# Altium PCB CONN-TH_XT90PW2X2-MGY_2026-10-20.pcbdoc
Units mm, origin at the board's own origin, x right, y up, seen from the top; angles counter-clockwise.
Board outline 49.52 x 53.59 mm, 2 copper layers (Top Layer, Bottom Layer); 1 components, 0 nets, 6 pads, 0 vias.
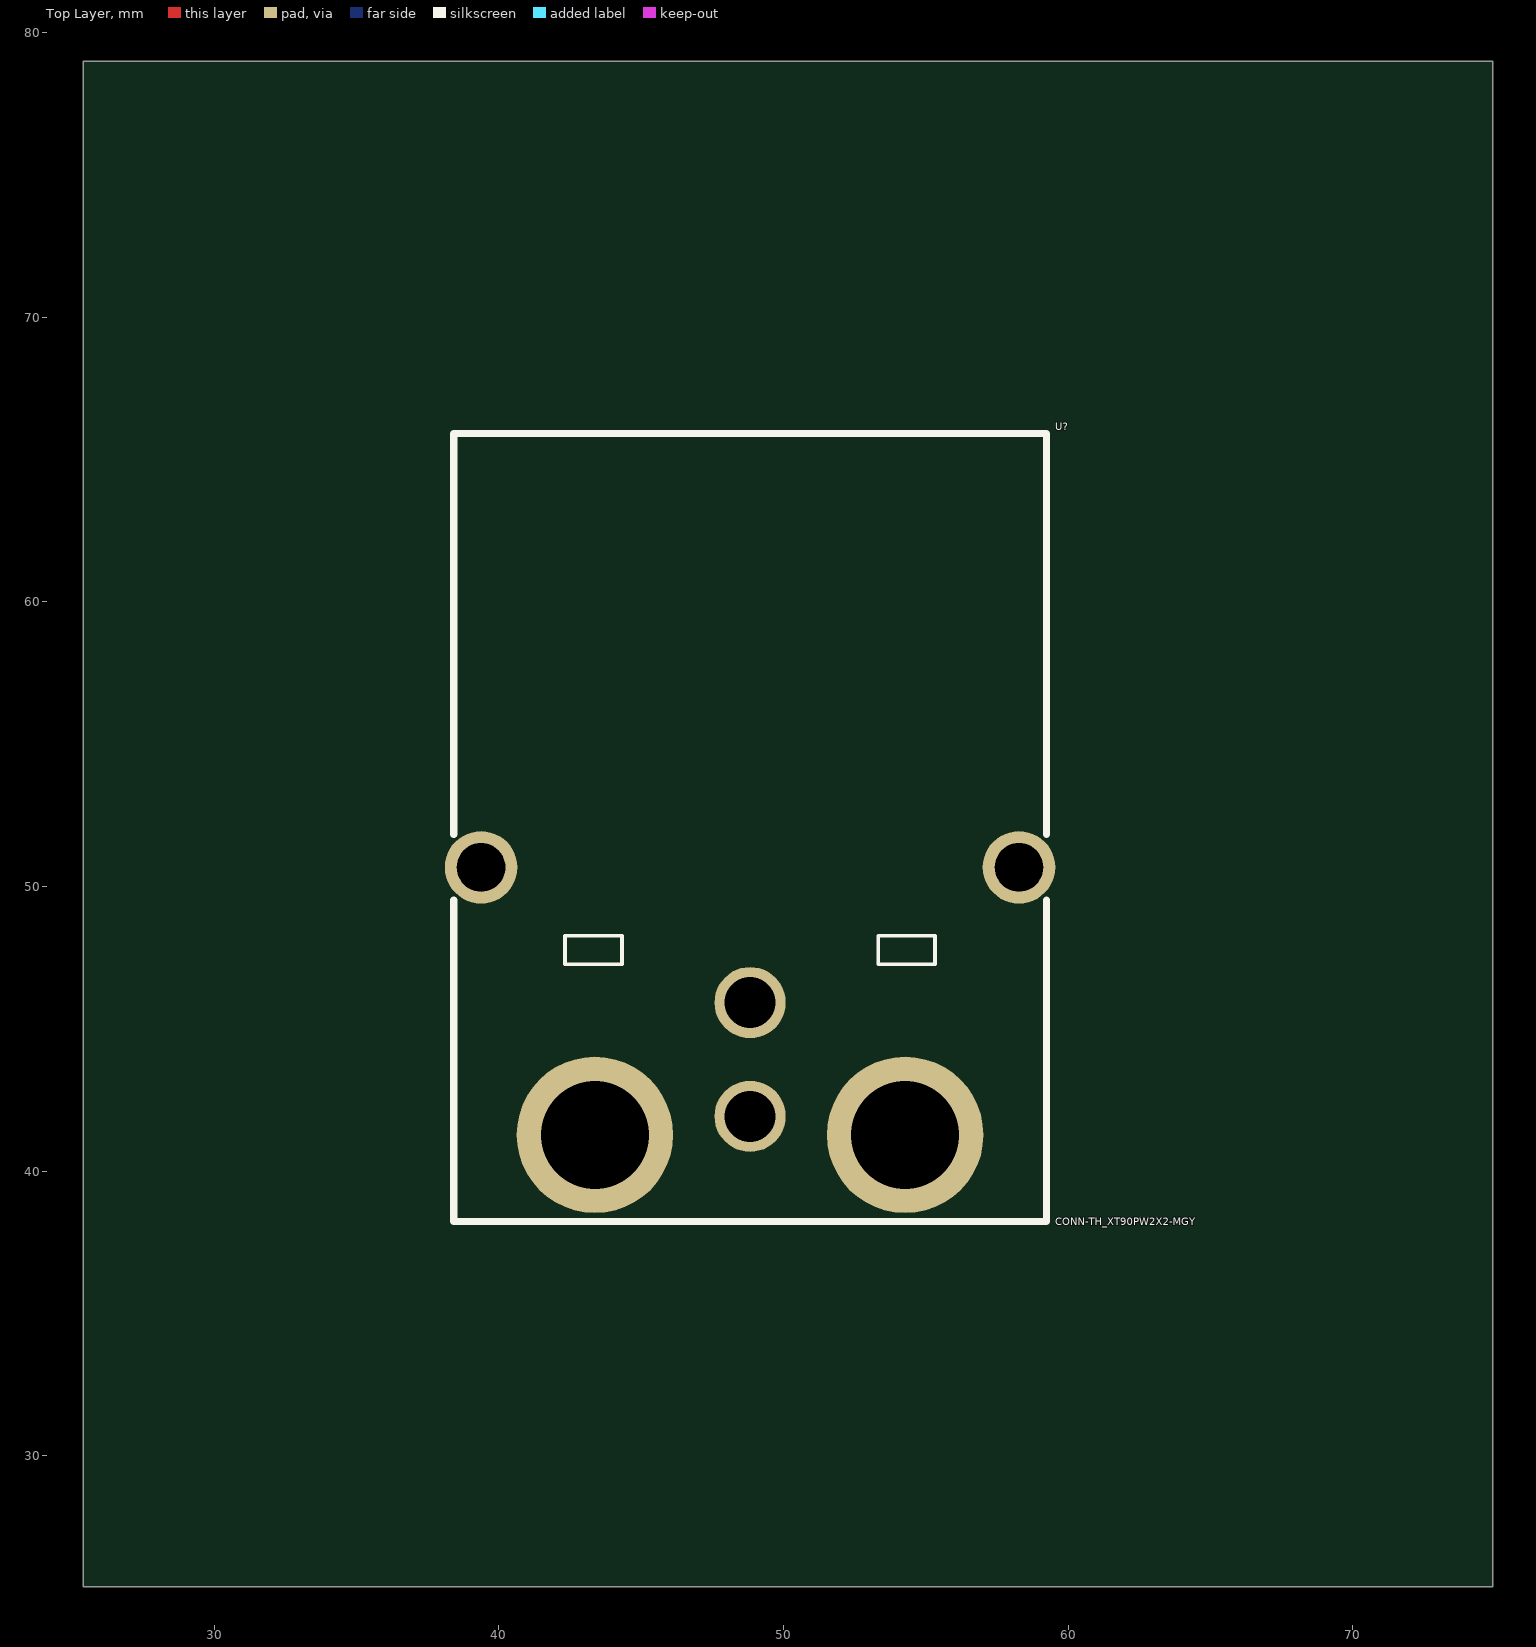
[diagram p0: Top Layer view]
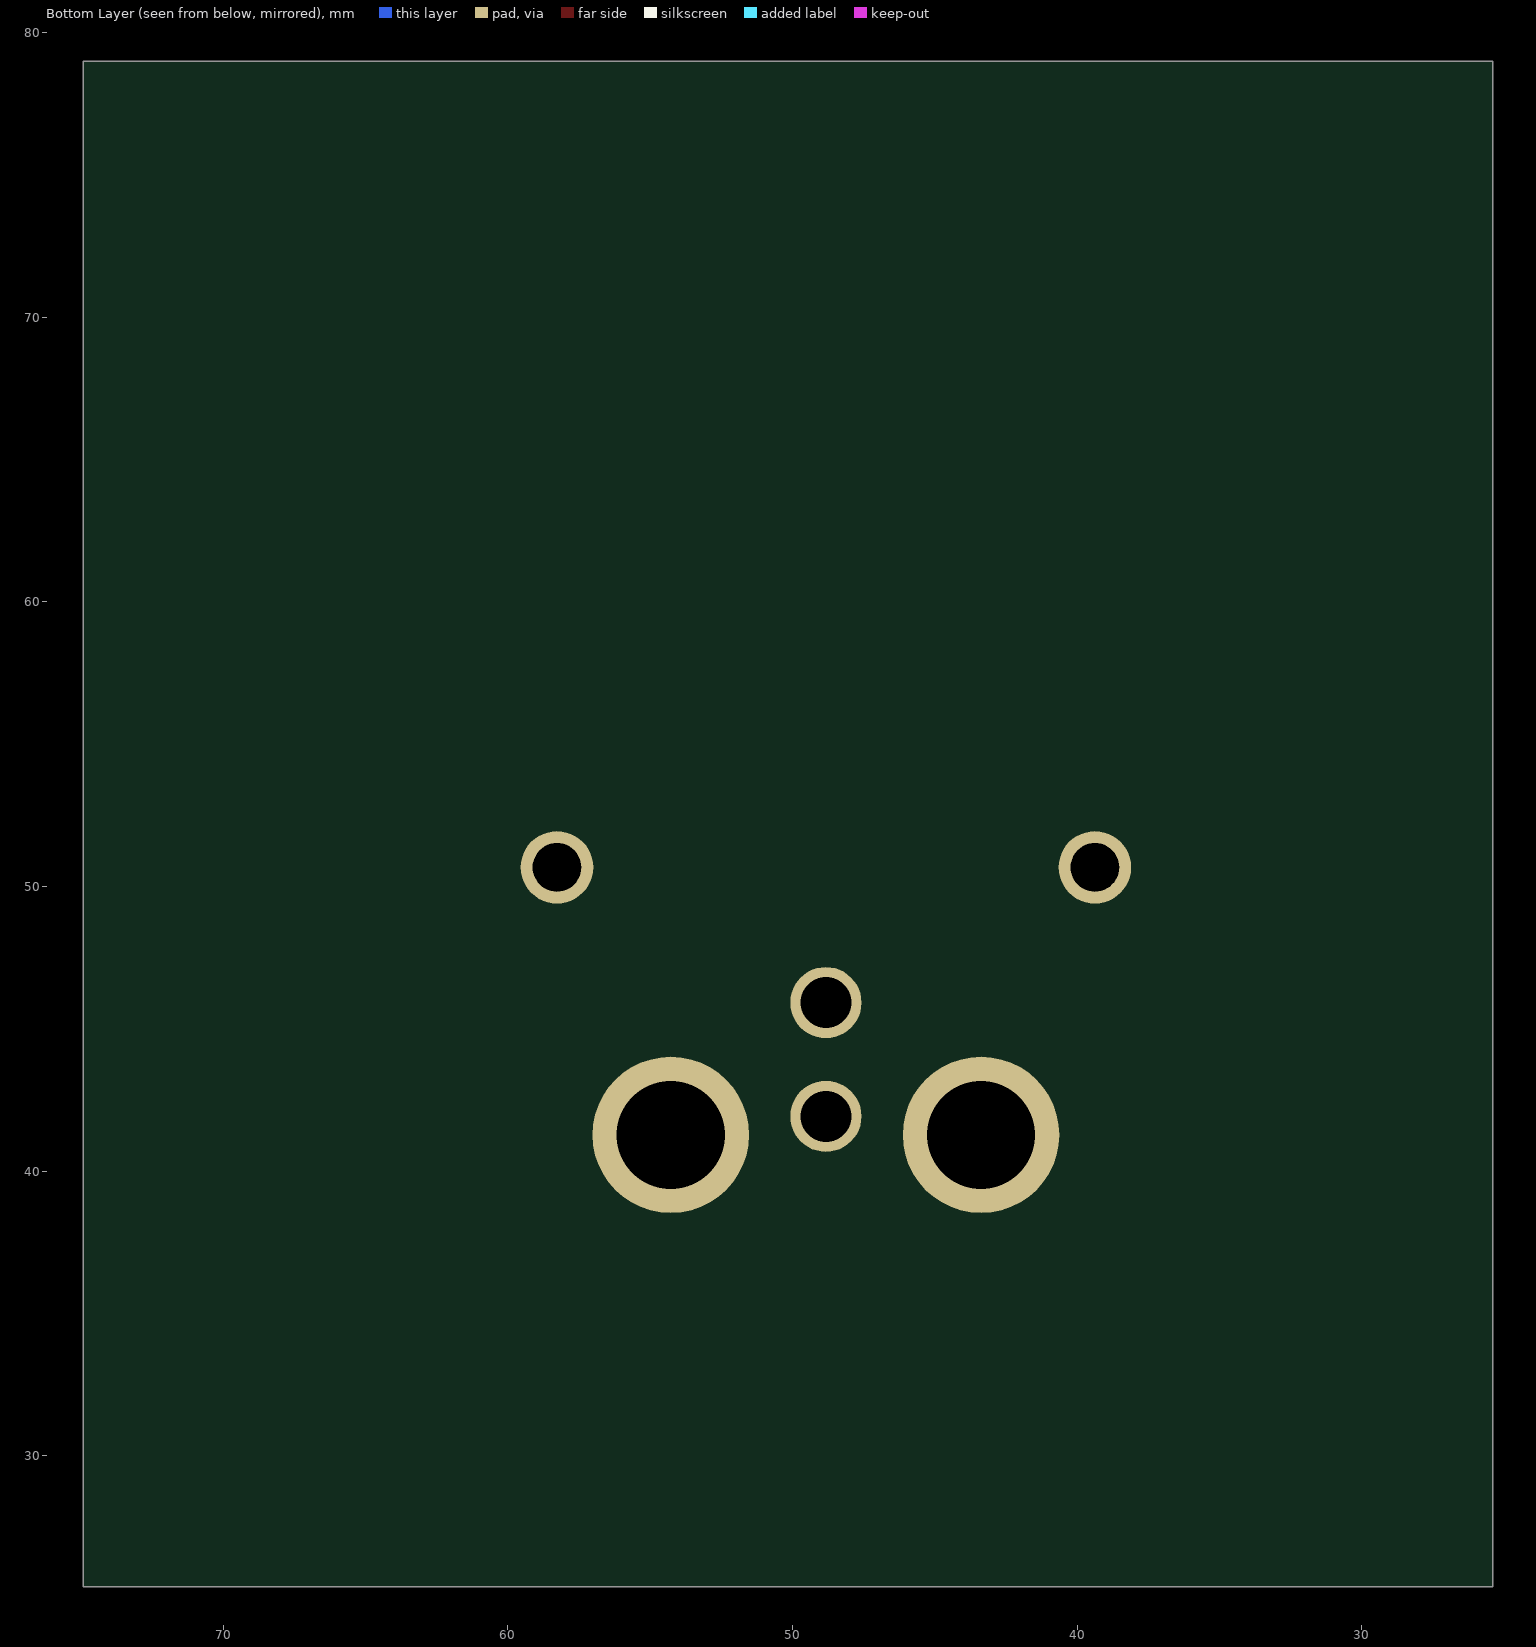
[diagram p1: Bottom Layer view, seen from below]

## Layer stack, top to bottom
Top Layer: signal copper (thickness not stored)
Dielectric: dielectric 0.32, FR-4, Dk 4.8
Bottom Layer: signal copper (thickness not stored)

## Board outline
74.917,25.4 25.4,25.4 25.4,78.994 74.917,78.994

## Components (designator, comment, footprint, x,y, rotation, side; value= is the part's Value field where it differs from the comment)
U? "CONN-TH_XT90PW2X2-MGY" CONN-TH_XT90PW2X2-MGY 48.825,52.07 r0 top

## Footprints (in the part's own frame and the unit in brackets; to place one, negate y for a bottom-side part, rotate by r counter-clockwise, add the part's x,y. Pads: shape width x height; smd on the part's side, far side on the other; paste and mask are expansions set on the pad)
CONN-TH_XT90PW2X2-MGY [mm]
  round 5.5 hole 3.8 paste+0 mask+0.05: 1(-5.45,-10.796) 2(5.45,-10.796)
  round 2.55 hole 1.7 slot 1.7 at 0 deg paste+0 mask+0.05: 3(9.45,-1.396) 4(-9.45,-1.396)
  round 2.5 hole 1.8 paste+0 mask+0.051: 5(0,-6.146) 6(0,-10.146)
  silkscreen extent -10.41,-13.84 10.41,13.84

## Nets (pads, with @x,y where several pads share a name; then routed paths per layer and width w, separated by ;. In a path a pad name is that pad's centre, name@x,y a point inside that pad or via, vN(x,y) a via of type N, cw(c..) or ccw(c..) an arc to the next point about the centre after c; other vN are vias at no path point)
pads on no net: U?.1 U?.2 U?.3 U?.4 U?.5 U?.6